# Altium PCB AM1D-240505DZ.PcbDoc
Units mm, origin at the board's own origin, x right, y up, seen from the top; angles counter-clockwise.
Board outline 30 x 56 mm, 2 copper layers (Top Layer, Bottom Layer); 9 components, 12 nets, 79 pads, 0 vias.
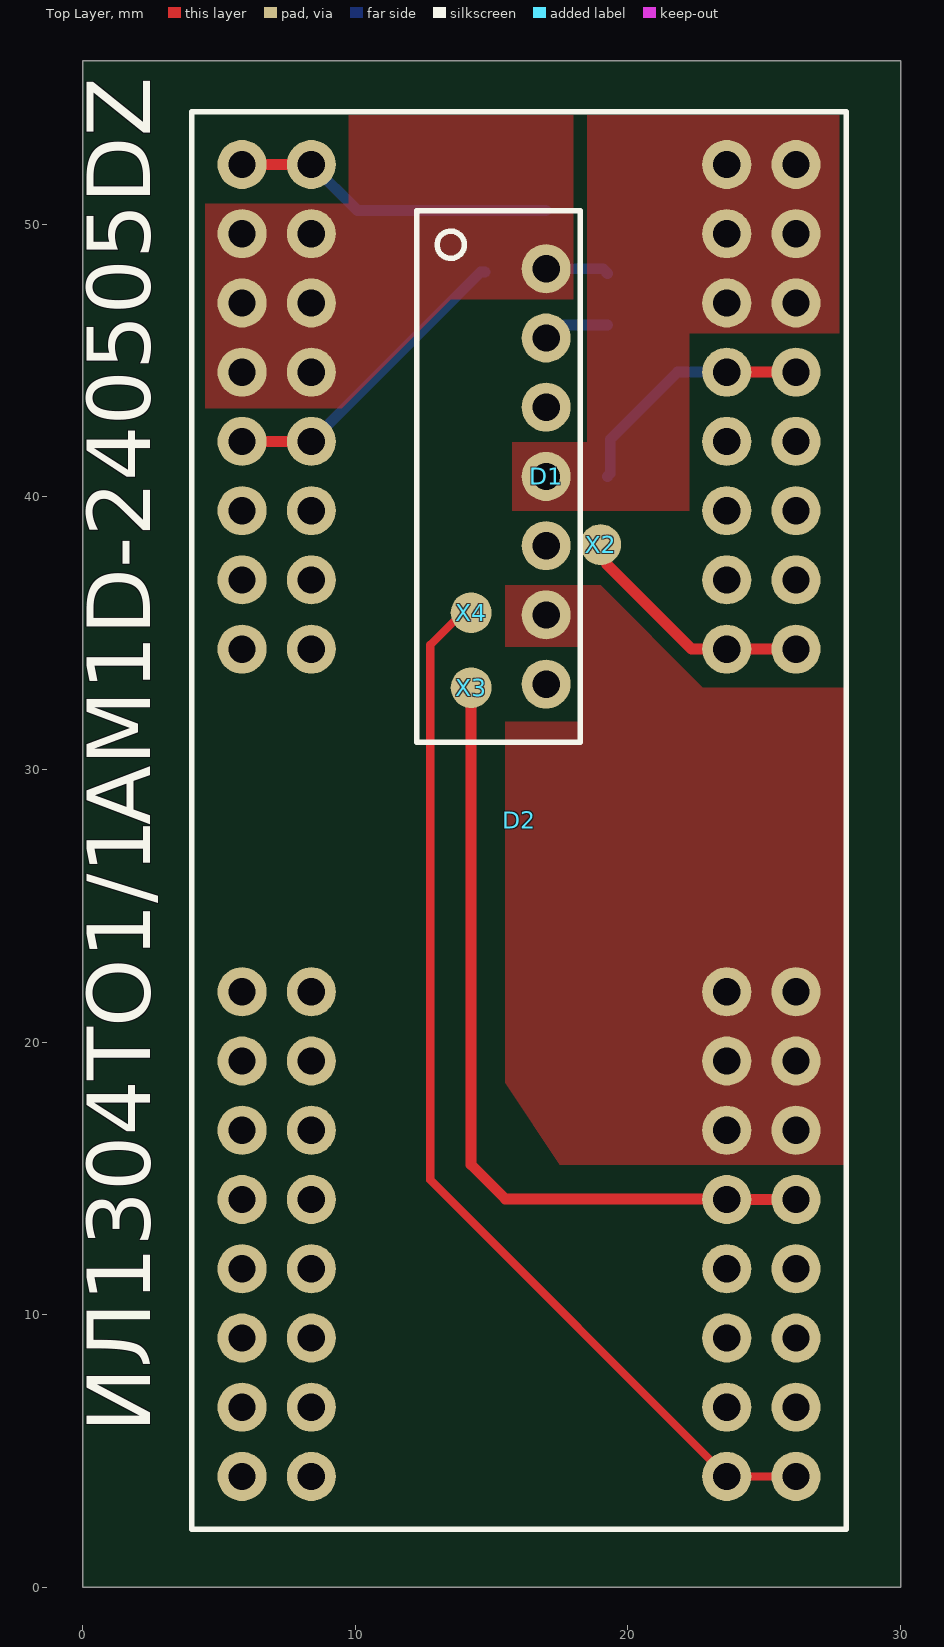
[diagram p0: Top Layer view]
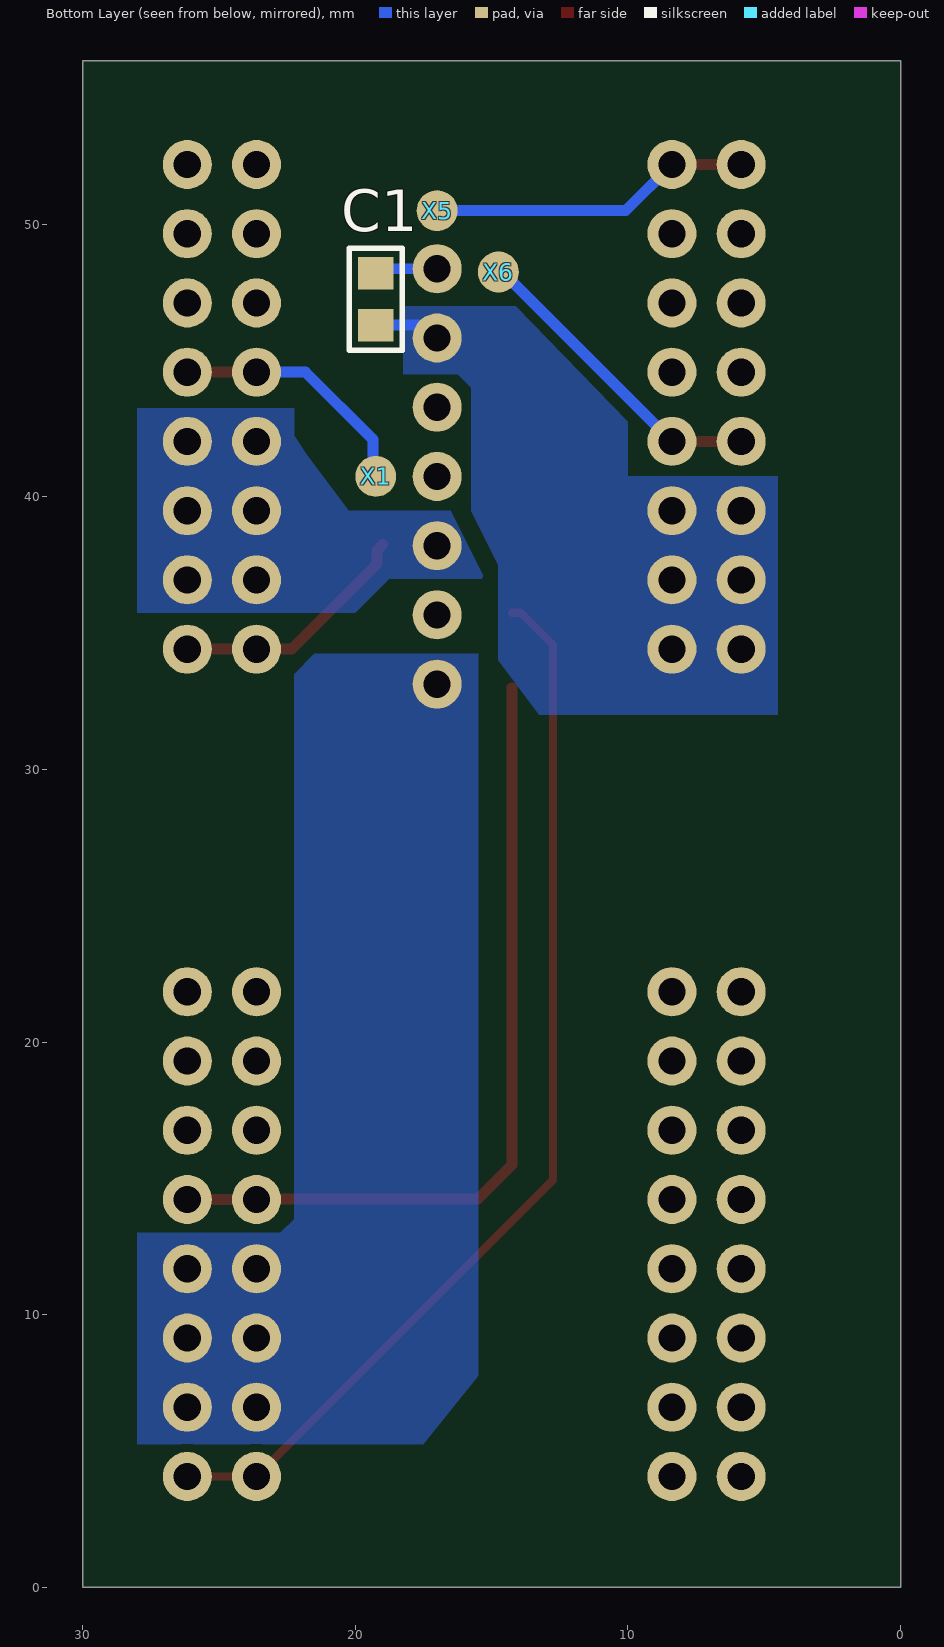
[diagram p1: Bottom Layer view, seen from below]

## Layer stack, top to bottom
Top Solder: solder mask 0.0102, Solder Resist, Dk 3.5
Top Layer: signal copper 0.0356
Dielectric 1: dielectric 0.32, FR-4, Dk 4.8
Bottom Layer: signal copper 0.0356
Bottom Solder: solder mask 0.0102, Solder Resist, Dk 3.5

## Board outline
0,0 30,0 30,56 0,56

## Design rules (kind name [scope] priority, off if disabled: settings)
Clearance [All] p1: gap=0.3 ignorepadtopadclearanceinfootprint=FALSE
ComponentClearance [All] p1: gap=0 collisioncheckmode=3 verticalgap=0 showdistances=FALSE
PlaneConnect [All] p1: planeconnectstyle=Direct reliefexpansion=0.508 reliefentries=4 reliefconductorwidth=0.254 reliefairgap=0.254
PolygonConnect [All] p1: connectstyle=Direct reliefconductorwidth=0.254 reliefentries=4 polygonreliefangle="90 Angle" airgapwidth=0.254
RoutingVias [All] p1: holewidth=0.4 width=1.2 viastyle="Through Hole" minholewidth=0.4 minwidth=0.8 maxholewidth=1.5 maxwidth=3
SilkToSolderMaskClearance [IsPad] p1: minsilkscreentomaskgap=0 clearancetoexposedcopper=TRUE
SolderMaskExpansion [All] p1: expansion=0.102 istentingtop=FALSE
Width [All] p1: maxlimit=0.8 minlimit=0.3 preferedwidth=0.4
27 further rules are at their usual default settings.

## Classes and differential pairs
component class Sheet1: C1 D2 X1 X2 X3 X4 X5 X6

## Components (designator, comment, footprint, x,y, rotation, side; value= is the part's Value field where it differs from the comment)
C1 "C0805" 0805 19.25,47.25 r270 bottom value=47uF
D1 "AM1D-240505DZ" AM1D-Z 17,40.75 r270 top
D2 "ИЛ103СП1/3" ИЛ103СП1/1 16.005,44.575 r0 top locked
X1 "PV" PV#1 19.75,41.25 r0 top
X2 "PV" PV#2 20.25,34.5 r0 top
X3 "PV" PV#3 12.25,31.5 r0 top
X4 "PV" PV#4 12.25,35.5 r0 top
X5 "PV" PV#5 11.5,52 r0 top
X6 "PV" PV#6 11.5,45 r0 top

## Footprints (in the part's own frame and the unit in brackets; to place one, negate y for a bottom-side part, rotate by r counter-clockwise, add the part's x,y. Pads: shape width x height; smd on the part's side, far side on the other; paste and mask are expansions set on the pad)
0805 [mm]
  rect 1.2x1.3 smd: 1(-0.95,0) 2(0.95,0)
  silkscreen extent -1.87,-0.97 1.87,0.97, body extent -1.05,-0.63 0.95,0.63, height 0.55
AM1D-Z [mm]
  round 1.8 hole 1: 1(-7.62,0) 2(-5.08,0) 3(-2.54,0) 4(0,0) 5(2.54,0) 6(5.08,0) 7(7.62,0)
  silkscreen extent -9.75,-4.75 9.75,1.25, body extent -9.14,-1.25 9.14,1.25, height 2.8
PV#1 [mm]
  round 1.5 smd far side: 1(-0.5,-0.5)
PV#2 [mm]
  round 1.5 smd: 1(-1.25,3.75)
PV#3 [mm]
  round 1.5 smd: 1(2,1.5)
PV#4 [mm]
  round 1.5 smd: 1(2,0.25)
PV#5 [mm]
  round 1.5 smd far side: 1(5.5,-1.5)
PV#6 [mm]
  round 1.5 smd far side: 1(3.25,3.25)
ИЛ103СП1/1 [mm]
  round 1.8 hole 1: 1(-10.16,7.62) 1(-7.62,7.62) 2(-10.16,0) 2(-10.16,2.54) 2(-10.16,5.08) 2(-7.62,0) 2(-7.62,2.54) 2(-7.62,5.08) 3(-10.16,-2.54) 3(-7.62,-2.54) 4(-10.16,-10.16) 4(-10.16,-7.62) 4(-10.16,-5.08) 4(-7.62,-10.16) 4(-7.62,-7.62) 4(-7.62,-5.08) 5(7.62,-7.62) 5(7.62,-5.08) 5(7.62,-2.54) 5(10.16,-7.62) 5(10.16,-5.08) 5(10.16,-2.54) 6(7.62,-10.16) 6(10.16,-10.16) 7(7.62,2.54) 7(7.62,5.08) 7(7.62,7.62) 7(10.16,2.54) 7(10.16,5.08) 7(10.16,7.62) 8(7.62,0) 8(10.16,0) 9(-10.16,-22.73) 9(-7.62,-22.73) 10(-10.16,-30.35) 10(-10.16,-27.81) 10(-10.16,-25.27) 10(-7.62,-30.35) 10(-7.62,-27.81) 10(-7.62,-25.27) 11(-10.16,-32.89) 11(-7.62,-32.89) 12(-10.16,-40.51) 12(-10.16,-37.97) 12(-10.16,-35.43) 12(-7.62,-40.51) 12(-7.62,-37.97) 12(-7.62,-35.43) 13(7.62,-37.97) 13(7.62,-35.43) 13(7.62,-32.89) 13(10.16,-37.97) 13(10.16,-35.43) 13(10.16,-32.89) 14(7.62,-40.51) 14(10.16,-40.51) 15(7.62,-27.81) 15(7.62,-25.27) 15(7.62,-22.73) 15(10.16,-27.81) 15(10.16,-25.27) 15(10.16,-22.73) 16(7.62,-30.35) 16(10.16,-30.35)
  silkscreen extent -12,-42.44 12,9.56, body extent -11.37,-41.88 11.36,8.92, height 2.5

## Part data
D1: library part AM1D-Z
C1: ComponentHeigt=1.3, Firme=AVX, KIND=Конденсатор, Leadform=SMD, Packaging=0805

## Nets (pads, with @x,y where several pads share a name; then routed paths per layer and width w, separated by ;. In a path a pad name is that pad's centre, name@x,y a point inside that pad or via, vN(x,y) a via of type N, cw(c..) or ccw(c..) an arc to the next point about the centre after c; other vN are vias at no path point)
"+V1 Output": D1.4 D2.7
"+V2 Output": D1.6 D2.15
"+V Input": C1.1 D1.1 D2.2 | length 2.3
  Bottom Layer w0.4: D1.1 19.08,48.37 C1.1
"-V1 Output": D1.5 D2.5
"-V2 Output": D1.7 D2.13
"-V Input": C1.2 D1.2 D2.4 | length 2.4
  Bottom Layer w0.4: D1.2 17.47,46.3 C1.2
PV2+: D2.8 X1.1 | length 9.2
  Top Layer w0.4: D2.8@23.625,44.575 D2.8@26.165,44.575
  Bottom Layer w0.4: X1.1 19.35,40.85 19.35,42.1 21.825,44.575 D2.8@23.625,44.575
PV2-: D2.6 X2.1 | length 9
  Top Layer w0.4: X2.1 19.21,38.04 19.21,37.54 22.335,34.415 D2.6@26.165,34.415
PV3+: D2.16 X3.1 | length 29.9
  Top Layer w0.4: X3.1 14.25,15.5 15.5,14.25 23.6,14.25 23.625,14.225 D2.16@26.165,14.225
PV3-: D2.14 X4.1 | length 39.5
  Top Layer w0.3: X4.1 13.925,35.75 12.75,34.575 12.75,14.94 23.625,4.065 D2.14@26.165,4.065
SEN+: D2.1 X5.1 | length 12.2
  Top Layer w0.4: D2.1@5.845,52.195 8.385,52.195 D2.1@8.597,51.983
  Bottom Layer w0.4: D2.1@8.385,52.195 10.08,50.5 X5.1
SEN-: D2.3 X6.1 | length 11.5
  Top Layer w0.4: D2.3@5.845,42.035 D2.3@8.385,42.035
  Bottom Layer w0.4: D2.3@8.385,42.035 14.6,48.25 X6.1
pads on no net: D1.3 D2.9 D2.10 D2.11 D2.12

## Polygon pours and split planes (outlines as drawn)
"+V2 Output" on Top Layer "NONET_L-01_P-001" (solid, remove dead copper, pour order 4): 15.5,36.75 15.5,15.5 28,15.5 28,33 22.75,33 19,36.75
"+V1 Output" on Top Layer "NONET_L-01_P-001" (solid, remove dead copper, pour order 2): 15.75,42 15.75,39.5 18.25,39.5 22.25,39.5 22.25,44 22.25,46 27.75,46 27.75,54 21,54 20.75,54 20.5,54 18.5,54 18.5,42
"+V Input" on Top Layer "NONET_L-01_P-001" (solid, pour order 0): 4.5,50.75 9.75,54 18,54 18,47.25 13.5,47.25 9.5,43.25 4.5,43.25
"-V1 Output" on Bottom Layer "NONET_L-01_P-001" (solid, remove dead copper, pour order 3): 16,38.5 16.5,39.5 17.75,39.5 18.25,39.5 20.25,39.5 21.75,41.5 22.25,42.25 22.25,43.25 28,43.25 28,35.75 22.062,35.75 20,35.75 18.75,37 17.25,37 15.25,37
"-V2 Output" on Bottom Layer "NONET_L-01_P-001" (solid, remove dead copper, pour order 5): 21.5,34.25 15.5,34.25 15.5,5.25 28,5.25 28,13 22.75,13 22.25,13.5 22.25,33.5
"-V Input" on Bottom Layer "NONET_L-01_P-001" (solid, remove dead copper, pour order 1): 18.25,47 14.109,47 10,42.75 10,40.75 4.5,40.75 4.5,32 14.75,32 14.75,37.5 15.75,39.5 15.75,44 16.25,44.5 18.25,44.5

## Other copper
Top Layer:
  pour cut-out: 15.5,18.5 15.5,15.5 17.5,15.5
  pour cut-out: 9.75,54 9.75,50.75 4.5,50.75
  pour cut-out: 15.5,34.5 15.5,31.75 18.25,31.75 18.25,34.5
Bottom Layer:
  pour cut-out: 14.75,34 14.75,32 13.25,32
  pour cut-out: 15.5,7.75 15.5,5.25 17.5,5.25

## Silkscreen, mask and mechanical layers (free items; w line width, h text height)
Top Overlay:
  text "AM1D-240505DZ" at 3.25,27.957 h4 r90
  text "ИЛ1304ТО1/1" at 3.25,5.664 h4 r90
Board:
  the board outline again, w0.2

## Dimensions
30,0 to 30,56 on Dimension
0,0 to 30,0 on Dimension